# Altium PCB Phaser.PcbDoc (part 6 of 16)
Units mm, origin at the board's own origin, x right, y up, seen from the top; angles counter-clockwise.
Board outline 161.99 x 100 mm, 6 copper layers (TopLayer, MidLayer1, MidLayer2, SignalLayer1, Internal Plane 1, BottomLayer), stack 1.528 mm thick; 1017 components, 665 nets, 3453 pads, 2223 vias.
Unrouted connection lines stored in the file: 1.
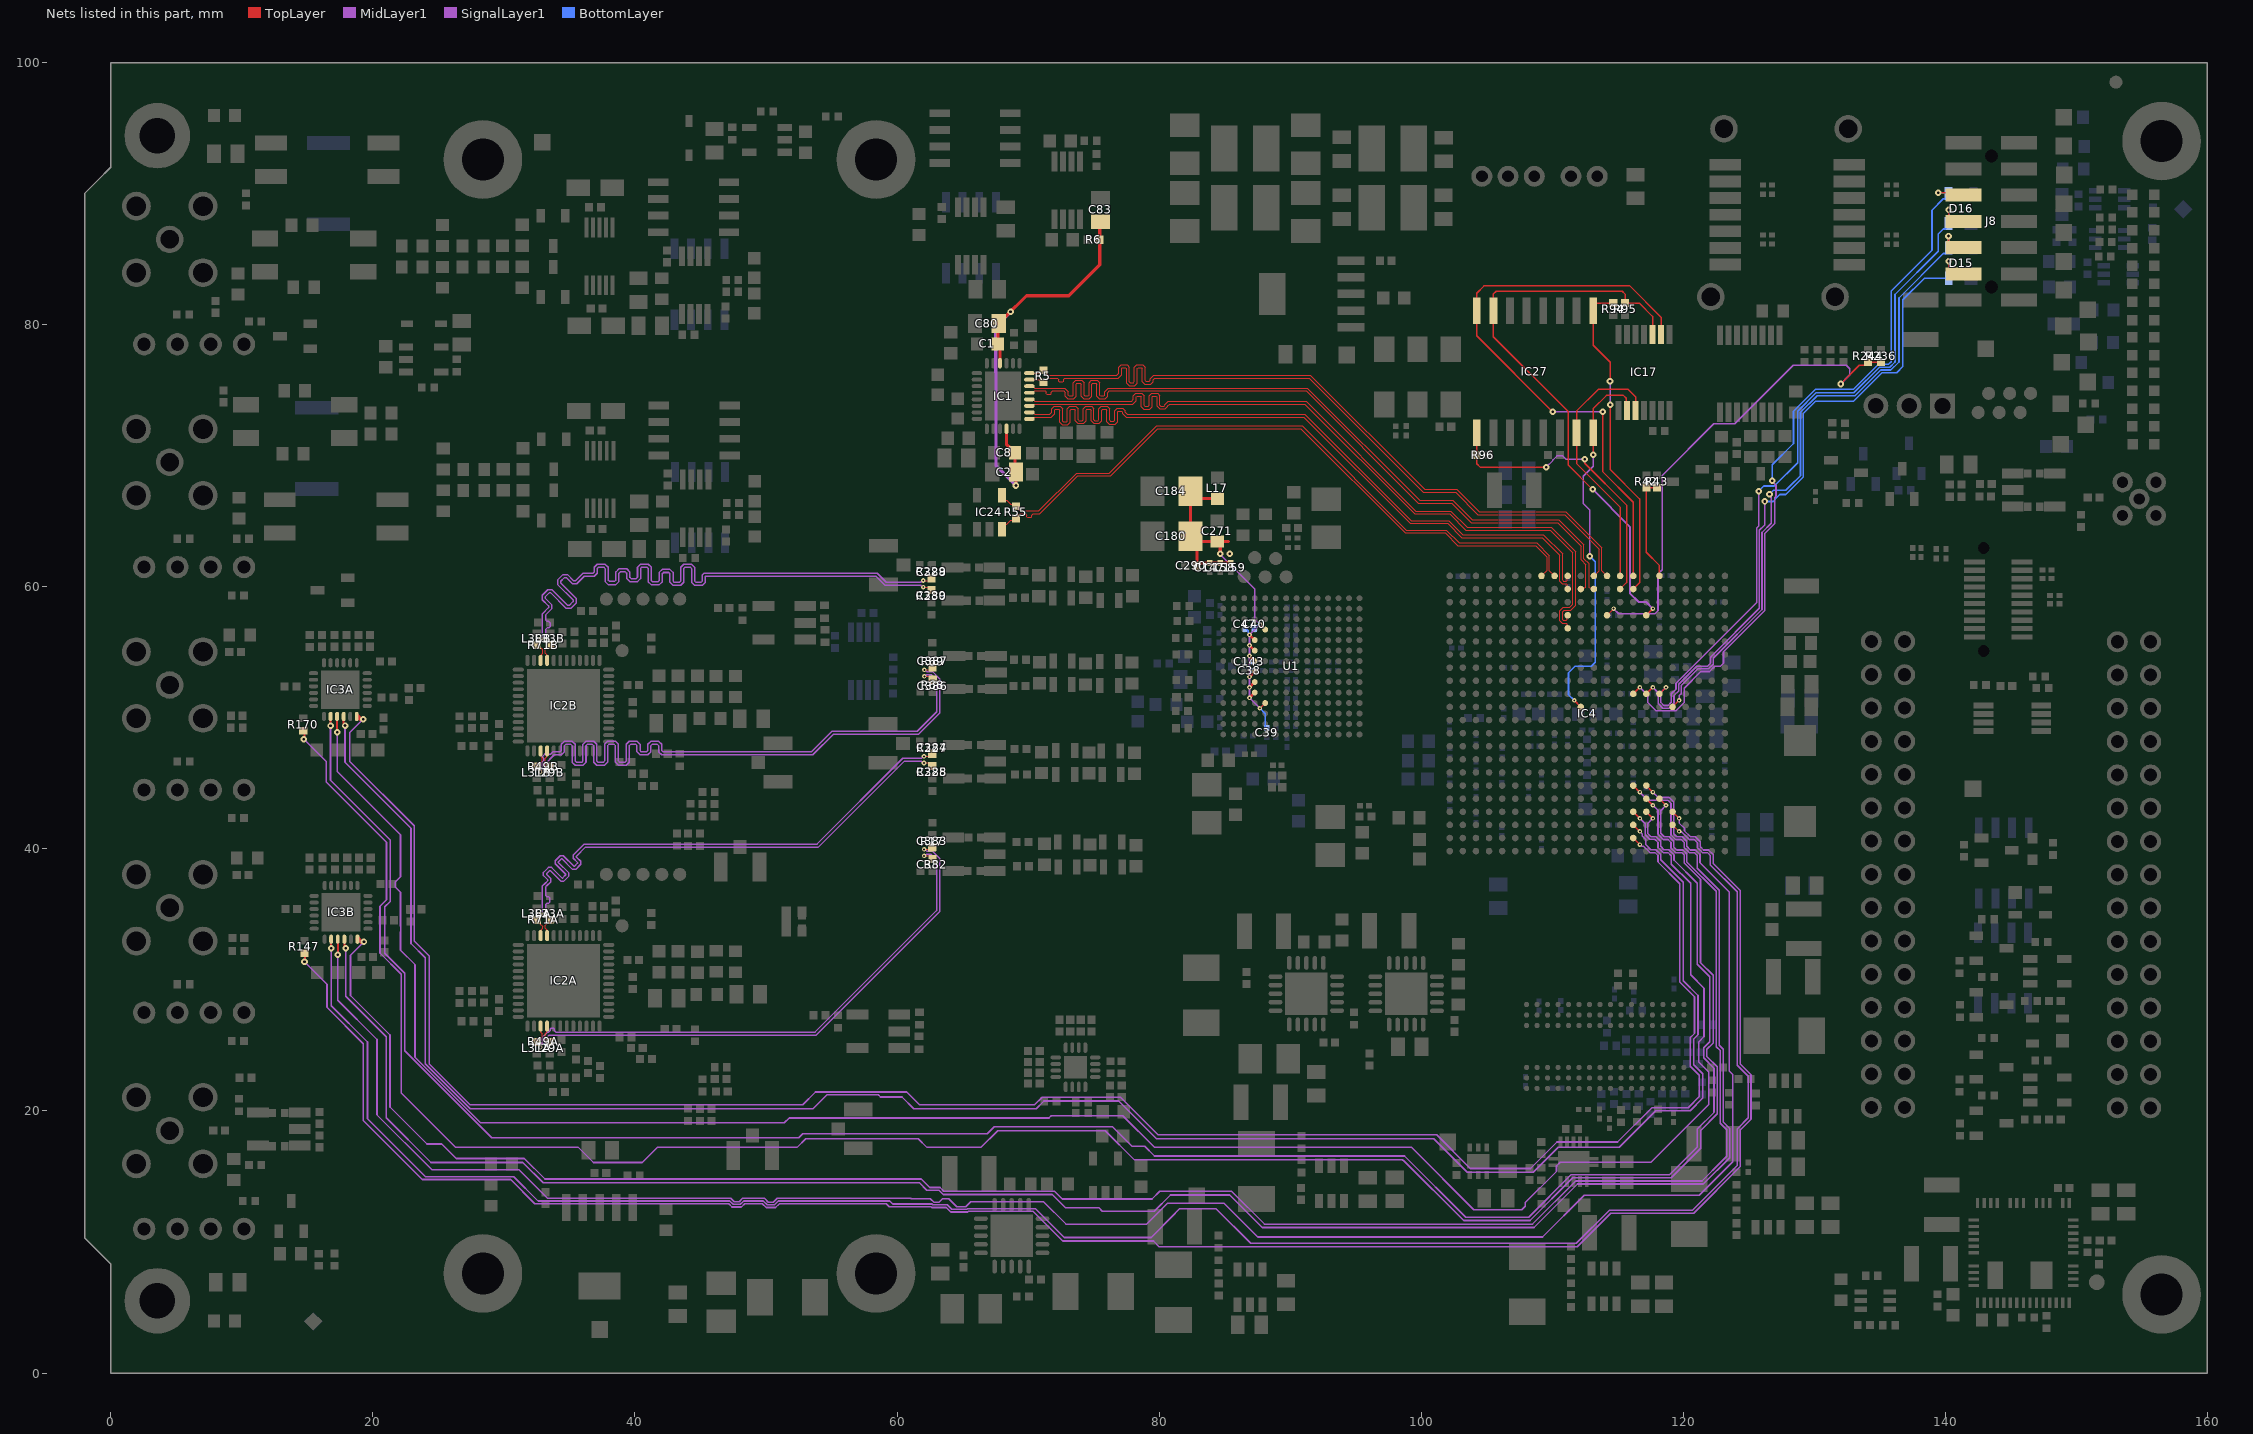
[diagram p8: the nets of this part, all layers, seen from the top]

## Via types
v1: diameter 0.5, hole 0.2, TopLayer to BottomLayer, tented both sides, 1374 vias
v2: diameter 0.35, hole 0.15, TopLayer to BottomLayer, tented both sides, 728 vias
v3: diameter 0.5, hole 0.2, TopLayer to BottomLayer, tented top, 96 vias
v4: diameter 0.6, hole 0.3, TopLayer to BottomLayer, 18 vias
v5: diameter 0.5, hole 0.2, TopLayer to BottomLayer, 5 vias
v6: diameter 0.35, hole 0.15, TopLayer to BottomLayer, 1 vias
v7: diameter 0.8, hole 0.5, TopLayer to BottomLayer, tented both sides, 1 vias

## Nets (pads, with @x,y where several pads share a name; then routed paths per layer and width w, separated by ;. In a path a pad name is that pad's centre, name@x,y a point inside that pad or via, vN(x,y) a via of type N, cw(c..) or ccw(c..) an arc to the next point about the centre after c; other vN are vias at no path point) (continued)
ADC_SCK_N: (continued)
  TopLayer w0.095: IC1.22@70.1,76.3 70.98,76.3 71.168,76.488 R5.1@71.168,76.527 ; R5.1@71.188,76.527 71.43,76.284 71.43,76.264 71.554,76.14 76.664,76.14 76.776,76.14 76.917,76.281 76.917,76.755 77.102,76.94 77.551,76.94 77.737,76.755 77.737,75.621 77.794,75.564 78.06,75.564 78.117,75.621 78.117,76.755 78.302,76.94 78.751,76.94 78.937,76.755 78.937,75.736 78.994,75.679 79.26,75.679 79.317,75.736 79.317,75.871 79.586,76.14 80.291,76.14 91.544,76.14 100.258,67.426 102.706,67.426 104.42,65.712 111.034,65.712 113.785,62.961 113.785,61.215 IC4.N22@114.175,60.825
ADC_SCK_P: IC1.21 IC4.M22 R5.2 | length 56.2
  TopLayer w0.095: IC1.21@70.1,75.8 70.91,75.8 71.123,75.587 R5.2@71.168,75.587 ; R5.2@71.188,75.587 71.43,75.829 71.43,75.849 71.501,75.92 71.807,75.92 71.949,75.92 72.234,75.92 72.329,75.825 72.329,75.681 72.386,75.624 72.652,75.624 72.709,75.681 72.709,75.825 72.804,75.92 73.007,75.92 76.664,75.92 76.867,75.92 77.137,76.19 77.137,76.663 77.194,76.72 77.46,76.72 77.517,76.663 77.517,75.53 77.702,75.344 78.151,75.344 78.337,75.53 78.337,76.663 78.394,76.72 78.66,76.72 78.717,76.663 78.717,75.644 78.902,75.459 79.351,75.459 79.537,75.644 79.537,75.78 79.677,75.92 80.291,75.92 91.453,75.92 100.167,67.206 102.615,67.206 104.329,65.492 110.943,65.492 113.565,62.87 113.565,61.215 IC4.M22@113.175,60.825
ADC_SDOA_N: IC1.16 IC4.K22 | length 56.2
  TopLayer w0.095: IC1.16@70.1,73.3 70.35,73.3 70.492,73.158 71.554,73.158 71.666,73.158 71.807,73.298 71.807,73.568 71.993,73.754 72.441,73.754 72.627,73.568 72.627,72.638 72.684,72.581 72.95,72.581 73.007,72.638 73.007,73.568 73.193,73.754 73.641,73.754 73.827,73.568 73.827,72.738 73.884,72.681 74.15,72.681 74.207,72.738 74.207,73.568 74.393,73.754 74.841,73.754 75.027,73.568 75.027,72.738 75.084,72.681 75.35,72.681 75.407,72.738 75.407,73.568 75.593,73.754 76.041,73.754 76.227,73.568 76.227,72.688 76.284,72.631 76.55,72.631 76.607,72.688 76.607,73.439 76.793,73.625 77.241,73.625 77.427,73.439 77.427,73.298 77.567,73.158 77.681,73.158 91.126,73.158 99.233,65.05 102.096,65.05 103.185,63.96 109.322,63.96 110.781,62.501 110.781,60.493 110.839,60.435 111.055,60.435 111.128,60.507 111.128,60.778 IC4.K22@111.175,60.825
ADC_SDOA_P: IC1.15 IC4.K21 | length 56.2
  TopLayer w0.095: IC1.15@70.1,72.8 70.35,72.8 70.488,72.938 71.554,72.938 71.757,72.938 72.027,73.207 72.027,73.477 72.084,73.534 72.35,73.534 72.407,73.477 72.407,72.547 72.593,72.361 73.041,72.361 73.227,72.547 73.227,73.477 73.284,73.534 73.55,73.534 73.607,73.477 73.607,72.647 73.793,72.461 74.241,72.461 74.427,72.647 74.427,73.477 74.484,73.534 74.75,73.534 74.807,73.477 74.807,72.647 74.993,72.461 75.441,72.461 75.627,72.647 75.627,73.477 75.684,73.534 75.95,73.534 76.007,73.477 76.007,72.597 76.193,72.411 76.641,72.411 76.827,72.597 76.827,73.348 76.884,73.405 77.15,73.405 77.207,73.348 77.207,73.207 77.476,72.938 77.681,72.938 91.035,72.938 99.142,64.83 102.004,64.83 103.094,63.74 109.231,63.74 110.561,62.41 110.561,60.402 110.748,60.215 111.055,60.215 111.128,60.143 111.128,59.872 IC4.K21@111.175,59.825
ADC_SDOB_N: IC1.20 IC4.M21 | length 56.1
  TopLayer w0.095: IC1.20@70.1,75.3 70.35,75.3 70.49,75.16 72.365,75.16 72.8,75.16 73.069,74.891 73.069,74.619 73.126,74.562 73.392,74.562 73.449,74.619 73.449,75.551 73.635,75.737 74.083,75.737 74.269,75.551 74.269,74.619 74.326,74.562 74.592,74.562 74.649,74.619 74.649,75.551 74.835,75.737 75.283,75.737 75.469,75.551 75.469,74.619 75.526,74.562 75.792,74.562 75.849,74.619 75.849,74.891 76.119,75.16 76.322,75.16 91.309,75.16 99.87,66.6 102.402,66.6 103.894,65.108 110.499,65.108 112.417,63.189 112.417,62.143 112.785,61.775 112.785,59.972 112.855,59.902 113.098,59.902 IC4.M21@113.175,59.825
ADC_SDOB_P: IC1.19 IC4.L21 | length 56.1
  TopLayer w0.095: IC1.19@70.1,74.8 70.35,74.8 70.49,74.94 70.875,74.94 71.018,74.94 71.303,74.94 71.398,74.845 71.398,74.726 71.455,74.669 71.721,74.669 71.778,74.726 71.778,74.845 71.873,74.94 72.02,74.94 72.365,74.94 72.709,74.94 72.849,74.799 72.849,74.528 73.035,74.342 73.483,74.342 73.669,74.528 73.669,75.46 73.726,75.517 73.992,75.517 74.049,75.46 74.049,74.528 74.235,74.342 74.683,74.342 74.869,74.528 74.869,75.46 74.926,75.517 75.192,75.517 75.249,75.46 75.249,74.528 75.435,74.342 75.883,74.342 76.069,74.528 76.069,74.799 76.21,74.94 76.322,74.94 91.218,74.94 99.778,66.38 102.311,66.38 103.803,64.888 110.408,64.888 112.197,63.098 112.197,62.051 112.565,61.684 112.565,59.972 112.495,59.902 112.252,59.902 IC4.L21@112.175,59.825
ASSY_Variant: IC4.N19 R236.1 R244.2 | length 37.9
  TopLayer w0.095: IC4.N19@114.175,57.825 v2(114.675,58.325)
  TopLayer w0.127: v1(131.998,75.469) 133.433,76.904 133.865,76.904 R244.2@134.092,77.13 ; R244.2@134.244,77.283 134.244,77.224 134.338,77.13 R236.1@135.087,77.13
  SignalLayer1 w0.127: v2(114.675,58.325) 115.064,57.937 117.836,57.937 118.064,58.164 118.064,60.968 118.382,61.287 118.382,68.489 122.322,72.429 123.916,72.429 128.391,76.904 132.423,76.904 132.695,76.633 132.695,76.166 v1(131.998,75.469)
ATT_CLK0: IC3A.21 IC4.R4 | length 162
  TopLayer w0.125: IC4.R4@116.175,42.825 v2(116.675,42.325)
  TopLayer w0.152: v1(17.275,48.9) IC3A.21@17.275,50.1
  SignalLayer1 w0.125: v1(17.275,48.9) 17.275,45.9 22.113,41.062 22.113,37.871 21.712,37.47 21.712,37.087 22.113,36.687 22.113,34.095 22.137,34.07 22.137,33.687 22.113,33.663 22.113,32.27 23.216,31.167 23.216,24.098 28.222,19.092 51.398,19.092 51.766,19.46 71.597,19.46 71.769,19.631 77.23,19.631 79.639,17.222 99.257,17.222 104.014,12.465 107.67,12.465 107.941,12.736 107.941,13.01 110.316,15.385 110.316,15.803 110.606,16.093 117.534,16.093 121.937,20.496 121.937,22.967 121.167,23.737 121.167,25.266 121.578,25.677 121.578,29.37 120.553,30.395 120.553,37.364 119.086,38.831 119.086,39.462 118.836,39.712 118.455,39.712 118.063,40.105 118.063,40.485 117.823,40.725 117.442,40.725 117.086,41.081 117.086,41.914 v2(116.675,42.325)
ATT_CLK1: IC3B.21 IC4.T6 | length 159
  TopLayer w0.125: IC4.T6@117.175,44.825 v2(117.675,44.325)
  TopLayer w0.152: v1(17.325,31.904) IC3B.21@17.325,33.104
  SignalLayer1 w0.125: v1(17.325,31.904) 17.325,28.444 20.323,25.446 20.323,19.696 24.511,15.508 31.151,15.508 33.331,13.328 47.32,13.328 47.576,13.072 47.959,13.072 48.215,13.328 49.882,13.328 50.178,13.032 50.561,13.032 50.858,13.328 61.041,13.328 61.067,13.303 62.545,13.303 62.816,13.032 63.199,13.032 63.469,13.303 63.954,13.303 64.562,12.695 65.241,12.695 65.625,13.079 71.179,13.079 72.892,11.366 79.051,11.366 80.627,12.942 84.963,12.942 87.528,10.378 109.25,10.378 112.431,13.559 121.204,13.559 123.762,16.117 123.762,22.778 123.501,23.039 123.501,36.699 121.27,38.93 121.27,39.562 120.919,39.914 120.535,39.914 120.264,40.185 120.264,40.569 119.919,40.914 119.49,40.914 119.264,41.14 119.264,43.569 118.919,43.914 118.086,43.914 v2(117.675,44.325)
ATT_LE0: IC3A.22 IC4.R3 | length 157.2
  TopLayer w0.125: IC4.R3@116.175,41.825 v2(116.675,41.325)
  TopLayer w0.152: IC3A.22@17.775,50.1 17.775,49.511 v1(17.879,49.407)
  SignalLayer1 w0.125: v1(17.879,49.407) 17.879,46.602 22.916,41.566 22.916,32.775 23.998,31.693 23.998,23.6 27.431,20.167 53.586,20.167 54.662,21.243 58.558,21.243 58.742,21.06 60.378,21.06 61.27,20.167 70.627,20.167 71.212,20.753 76.927,20.753 79.795,17.884 100.952,17.884 103.516,15.321 108.556,15.321 110.458,17.222 115.099,17.222 117.893,20.016 120.516,20.016 121.488,20.987 121.488,22.837 120.799,23.526 120.799,25.489 121.115,25.805 121.115,28.813 119.984,29.943 119.984,37.454 118.264,39.174 118.264,39.569 117.895,39.937 117.515,39.937 117.127,40.325 117.127,40.718 116.87,40.975 116.87,41.13 v2(116.675,41.325)
ATT_LE1: IC3B.22 IC4.R6 | length 157
  TopLayer w0.125: IC4.R6@116.175,44.825 v2(116.675,44.325)
  TopLayer w0.152: IC3B.22@17.825,33.104 17.825,32.515 v1(17.929,32.411)
  SignalLayer1 w0.125: v1(17.929,32.411) 17.929,28.75 21.014,25.665 21.014,19.49 24.434,16.069 31.438,16.069 32.995,14.513 61.721,14.513 62.277,13.957 63.199,13.957 63.535,13.621 71.845,13.621 72.867,12.599 75.421,12.599 75.666,12.354 79.635,12.354 80.862,13.58 85.393,13.58 87.866,11.108 108.6,11.108 111.917,14.425 121.519,14.425 123.532,16.438 123.532,18.658 123.034,19.156 123.034,24.708 122.739,25.002 122.739,36.845 121.063,38.522 121.063,39.485 120.836,39.712 120.452,39.712 120.063,40.102 120.063,40.485 119.836,40.712 119.665,40.712 119.407,40.712 119.063,41.057 119.063,43.485 118.836,43.712 117.288,43.712 v2(116.675,44.325)
ATT_RST0n: IC3A.20 IC4.T4 | length 164.4
  TopLayer w0.125: IC4.T4@117.175,42.825 v2(117.675,42.325)
  TopLayer w0.152: v1(16.775,49.4) IC3A.20@16.775,50.1
  SignalLayer1 w0.125: v1(16.775,49.4) 16.775,45.224 21.323,40.676 21.323,35.985 20.916,35.578 20.916,32.034 22.439,30.511 22.439,24.59 29.085,17.944 52.49,17.944 52.801,18.256 66.889,18.256 67.423,18.789 76.443,18.789 77.935,17.297 78.904,17.297 79.639,16.562 98.725,16.562 103.391,11.895 108.198,11.895 111.43,15.128 118.948,15.128 121.065,17.245 121.065,18.616 122.336,19.887 122.336,23.264 121.545,24.054 121.545,24.811 122.019,25.284 122.019,30.238 121.061,31.196 121.061,37.374 119.288,39.147 119.288,39.545 118.895,39.937 118.515,39.937 118.264,40.188 118.264,40.569 117.906,40.926 117.526,40.926 117.288,41.164 117.288,41.937 v2(117.675,42.325)
ATT_RST1n: IC3B.20 IC4.V3 | length 157.4
  TopLayer w0.125: IC4.V3@119.175,41.825 v2(119.675,41.325)
  TopLayer w0.152: v1(16.825,32.404) IC3B.20@16.825,33.104
  SignalLayer1 w0.125: v1(16.825,32.404) 16.825,28.029 19.591,25.263 19.591,19.395 24.013,14.973 30.764,14.973 32.61,13.127 47.236,13.127 47.493,12.871 48.042,12.871 48.299,13.127 49.799,13.127 50.095,12.831 50.645,12.831 50.941,13.127 59.437,13.127 59.663,12.9 62.663,12.9 62.732,12.831 63.842,12.831 64.18,12.493 65.324,12.493 65.374,12.543 70.56,12.543 72.757,10.346 79.39,10.346 81.225,12.181 81.225,12.217 81.551,12.543 84.333,12.543 86.983,9.893 111.838,9.893 114.371,12.426 120.691,12.426 124.126,15.861 124.126,18.64 124.958,19.472 124.958,22.641 124.107,23.491 124.107,36.722 122.063,38.767 122.063,39.485 121.836,39.712 121.455,39.712 121.08,40.088 121.08,40.468 120.836,40.712 120.455,40.712 119.886,41.282 119.718,41.282 v2(119.675,41.325)
ATT_S_IN0: IC3A.24 IC4.R2 | length 156.1
  TopLayer w0.125: IC4.R2@116.175,40.825 v2(116.675,40.325)
  TopLayer w0.3: IC3A.24@18.775,50.1 18.825,50.15 19.075,49.9 v1(19.275,49.9)
  SignalLayer1 w0.125: v1(19.275,49.9) 18.248,48.873 18.248,46.659 23.156,41.751 23.156,32.96 24.298,31.817 24.298,23.584 27.421,20.462 52.801,20.462 53.783,21.444 60.733,21.444 61.715,20.462 70.497,20.462 71.088,21.053 77.051,21.053 79.919,18.185 101.173,18.185 103.746,15.612 108.34,15.612 110.353,17.624 114.977,17.624 117.604,20.252 120.377,20.252 121.223,21.097 121.223,22.727 120.533,23.416 120.533,25.599 120.849,25.915 120.849,28.703 119.718,29.834 119.718,37.344 118.063,39 118.063,39.485 117.836,39.712 117.455,39.712 116.985,40.183 116.861,40.183 116.718,40.325 v2(116.675,40.325)
ATT_S_IN1: IC3B.24 IC4.U5 | length 153.5
  TopLayer w0.125: IC4.U5@118.175,43.825 v2(118.675,43.325)
  TopLayer w0.3: IC3B.24@18.825,33.104 18.875,33.154 19.125,32.904 v1(19.325,32.904)
  SignalLayer1 w0.125: v1(19.325,32.904) 18.298,31.876 18.298,28.806 21.314,25.789 21.314,20.305 24.138,17.481 25.26,17.481 26.372,16.37 31.562,16.37 33.131,14.801 61.858,14.801 62.5,14.159 63.282,14.159 63.565,13.875 72.016,13.875 72.612,13.279 79.455,13.279 80.057,13.881 85.518,13.881 88.032,11.366 108.493,11.366 111.78,14.653 121.424,14.653 122.96,16.189 122.974,16.189 123.245,16.46 123.245,16.473 123.303,16.532 123.303,18.564 122.805,19.062 122.805,24.613 122.511,24.908 122.511,36.753 120.264,39.001 120.264,39.616 119.966,39.914 119.488,39.914 119.264,40.138 119.264,40.571 118.921,40.914 118.538,40.914 118.264,41.188 118.264,42.914 v2(118.675,43.325)
ATT_S_OUT0: IC4.T5 R170.1 | length 169.6
  TopLayer w0.125: IC4.T5@117.175,43.825 v2(117.675,43.325)
  TopLayer w0.152: v1@14.775,48.4 R170.1@14.775,49.1
  SignalLayer1 w0.125: v1(14.735,48.375) 16.453,46.657 16.453,45.095 21.042,40.507 21.042,36.117 20.55,35.625 20.55,32.049 22.171,30.429 22.171,21.364 26.319,17.215 35.688,17.215 36.834,16.069 40.561,16.069 41.707,17.215 52.366,17.215 53.035,17.885 61.618,17.885 62.287,17.215 62.845,17.215 66.398,17.215 67.675,18.492 75.887,18.492 78.117,16.263 80.904,16.263 98.567,16.263 98.585,16.244 98.637,16.244 103.237,11.644 108.302,11.644 111.569,14.912 119.087,14.912 121.316,17.141 121.316,18.512 122.587,19.783 122.587,23.368 121.796,24.158 121.796,24.707 122.27,25.18 122.27,30.342 121.312,31.3 121.312,37.668 120.063,38.917 120.063,39.533 119.883,39.712 119.405,39.712 119.063,40.055 119.063,40.164 119.063,40.485 118.836,40.712 118.455,40.712 118.063,41.105 118.063,42.937 v2(117.675,43.325)
ATT_S_OUT1: IC4.V4 R147.1 | length 157.1
  TopLayer w0.125: IC4.V4@119.175,42.825 v2(119.675,42.325)
  TopLayer w0.152: v1@14.825,31.404 R147.1@14.825,32.104
  SignalLayer1 w0.125: v1(14.785,31.379) 16.503,29.66 16.503,27.9 19.272,25.132 19.272,19.263 23.763,14.772 30.515,14.772 32.361,12.926 47.153,12.926 47.409,12.67 48.126,12.67 48.382,12.926 49.715,12.926 50.012,12.63 50.728,12.63 51.024,12.926 59.187,12.926 59.414,12.699 62.58,12.699 62.649,12.63 63.759,12.63 64.097,12.292 65.408,12.292 65.448,12.333 70.393,12.333 72.656,10.07 79.565,10.07 79.993,9.643 111.91,9.643 114.466,12.198 120.785,12.198 124.345,15.758 124.345,18.549 125.159,19.363 125.159,22.751 124.335,23.574 124.335,36.817 122.27,38.882 122.27,39.562 121.919,39.914 121.538,39.914 121.288,40.164 121.288,40.545 120.919,40.914 120.538,40.914 120.086,41.366 120.086,41.566 119.675,41.978 v2(119.675,42.325)
AVDD33: C38.2 C39.2 C40.2 C47.2 C143.2 C147.2 C158.2 C159.2 C180.1 C184.1 C271.2 C290.2 L17.1 U1.D10 U1.E11 U1.F11 U1.G11 U1.H11 U1.J11 U1.K11 U1.L10 | length 36.3
  TopLayer w0.125: v2(87.693,50.725) U1.D10@88.093,51.125
  TopLayer w0.2: v2(86.893,51.525) U1.E11@87.293,51.925 ; v2(86.893,52.325) U1.F11@87.293,52.725 ; v2(86.893,53.125) U1.G11@87.293,53.525 ; v2(86.893,54.725) U1.H11@87.293,54.325 ; v2(86.893,55.525) U1.J11@87.293,55.125 ; v2(86.893,56.325) U1.K11@87.293,55.925 ; v2(87.701,57.122) 87.701,57.119 88.093,56.727 U1.L10@88.093,56.725
  TopLayer w0.25: C180.1@82.893,63.35 C290.2@82.893,61.6 83.099,61.806 C147.2@83.862,61.806 C158.2@84.663,61.806 C159.2@85.462,61.806 ; L17.1@84.443,66.725 82.757,66.725 82.393,67.089 C180.1@82.393,63.85 82.793,63.45 C271.2@84.443,63.45 85.267,63.45 ; C271.2@84.543,63.349 84.663,63.229 v1(84.663,62.518)
  MidLayer1 w0.125: v1@84.625,62.525 84.625,62.5 87.3,59.825 87.3,57.518 v2@87.696,57.122 ; v2(87.693,50.725) v2(86.893,51.525) v2(86.893,52.325) v2(86.893,53.125) v2(86.893,54.725) v2(86.893,55.525) v2(86.893,56.325) 86.899,56.325 v2@87.695,57.122 ; v2@87.695,57.122 v2(87.701,57.122) v2@87.696,57.122
  BottomLayer w0.125: C47.2@86.657,56.769 86.789,56.637 86.789,56.466 86.893,56.363 v2(86.893,56.325) ; v2(86.893,53.125) 86.893,53.17 87.034,53.311 87.034,53.389 87.059,53.414 87.059,53.487 C38.2@87.221,53.65 ; v2(86.893,54.725) 86.893,54.554 C143.2@87.221,54.225 ; C40.2@87.178,56.772 87.484,57.079 87.658,57.079 v2(87.701,57.122) ; v2(87.693,50.725) 88.105,50.312 88.105,49.338 C39.2@88.218,49.225
  other v1: 85.378,62.518
BBIA_N: C383.2 IC2A.28 L29A.1 R17.1 R49A.1 | length 42.8
  TopLayer w0.095: IC2A.28@33.275,26.475 33.263,26.463 33.263,26.014 33.147,25.898 33.147,25.518 33.203,25.462 33.217,25.462 33.287,25.392 v2(33.287,24.85) ; v2(62.064,39.964) 62.476,39.964 C383.2@62.696,40.184
  SignalLayer1 w0.115: v2(33.287,24.85) 33.287,24.902 33.155,25.034 33.155,25.48 33.459,25.784 53.841,25.784 63.251,35.194 63.251,39.273 62.693,39.831 62.249,39.831 62.116,39.964 v2(62.064,39.964)
BBIA_P: C382.2 IC2A.27 L31A.1 R3.1 R49A.2 | length 42.8
  TopLayer w0.095: v2(32.787,24.85) 32.787,25.285 32.787,25.575 32.927,25.715 32.927,25.897 32.824,26 32.824,26.426 IC2A.27@32.796,26.454 ; v2(62.064,39.464) 62.476,39.464 R3.1@62.696,39.244
  SignalLayer1 w0.115: v2(32.787,24.85) 32.787,24.902 32.92,25.034 32.92,25.577 33.361,26.019 33.419,26.019 33.534,26.134 33.534,26.25 33.597,26.313 33.786,26.313 33.849,26.25 33.849,26.134 33.964,26.019 34.082,26.019 53.743,26.019 63.016,35.291 63.016,39.176 62.595,39.596 62.249,39.596 62.116,39.464 v2(62.064,39.464)
BBIB_N: C387.2 IC2B.28 L29B.1 R49B.1 R69.1 | length 49.8
  TopLayer w0.095: IC2B.28@33.279,47.496 33.261,47.478 33.261,47.028 33.151,46.919 33.151,46.594 33.224,46.521 33.224,46.297 33.288,46.234 33.288,45.875 v2@33.292,45.871 ; v2(62.08,53.654) 62.492,53.654 C387.2@62.712,53.874
  SignalLayer1 w0.115: v2(33.288,45.85) 33.288,45.902 33.155,46.034 33.155,46.48 33.847,47.172 34.383,47.172 34.617,47.406 34.617,47.875 34.713,47.971 35.111,47.971 35.207,47.875 35.207,46.607 35.441,46.373 36.033,46.373 36.267,46.607 36.267,47.875 36.363,47.971 36.761,47.971 36.857,47.875 36.857,46.607 37.091,46.373 37.683,46.373 37.917,46.607 37.917,47.875 38.013,47.971 38.411,47.971 38.507,47.875 38.507,46.607 38.741,46.373 39.333,46.373 39.567,46.607 39.567,47.875 39.663,47.971 40.061,47.971 40.157,47.875 40.157,47.406 40.391,47.172 40.983,47.172 41.217,47.406 41.217,47.875 41.313,47.971 41.711,47.971 41.807,47.875 41.807,47.406 42.041,47.172 53.573,47.172 55.141,48.74 61.641,48.74 63.267,50.366 63.267,52.964 62.709,53.522 62.265,53.522 62.132,53.654 v2(62.08,53.654)
BBIB_P: C386.2 IC2B.27 L31B.1 R49B.2 R68.1 | length 49.9
  TopLayer w0.095: L31B.1@32.5,46.297 32.523,46.297 32.767,46.541 32.767,46.565 32.931,46.728 32.931,46.756 32.931,46.919 32.837,47.013 32.837,47.438 IC2B.27@32.8,47.475 ; v2@32.792,45.871 R49B.2@32.792,46.258 ; v2(62.08,53.154) 62.492,53.154 R68.1@62.712,52.934
  SignalLayer1 w0.115: v2(32.788,45.85) 32.788,45.902 32.92,46.034 32.92,46.577 33.01,46.667 33.05,46.708 33.05,46.87 32.979,46.942 32.979,47.082 33.189,47.292 33.329,47.292 33.4,47.22 33.563,47.22 33.75,47.407 34.286,47.407 34.382,47.503 34.382,47.972 34.616,48.206 35.208,48.206 35.442,47.972 35.442,46.704 35.538,46.608 35.936,46.608 36.032,46.704 36.032,47.972 36.266,48.206 36.858,48.206 37.092,47.972 37.092,46.704 37.188,46.608 37.586,46.608 37.682,46.704 37.682,47.972 37.916,48.206 38.508,48.206 38.742,47.972 38.742,46.704 38.838,46.608 39.236,46.608 39.332,46.704 39.332,47.972 39.566,48.206 40.158,48.206 40.392,47.972 40.392,47.503 40.488,47.407 40.886,47.407 40.982,47.503 40.982,47.972 41.216,48.206 41.808,48.206 42.042,47.972 42.042,47.503 42.138,47.407 53.475,47.407 55.044,48.975 61.544,48.975 63.032,50.464 63.032,52.866 62.611,53.287 62.265,53.287 62.132,53.154 v2(62.08,53.154)
BBQA_N: C385.2 IC2A.9 L33A.1 R71A.2 R228.1 | length 42.7
  TopLayer w0.095: IC2A.9@33.3,33.375 33.272,33.403 33.272,33.829 33.168,33.932 33.168,34.159 33.276,34.267 33.276,34.639 33.312,34.676 33.312,34.975 v2@33.308,34.979 ; v2(62.055,46.55) 62.466,46.55 R228.1@62.686,46.33
  SignalLayer1 w0.115: v2(33.312,35) 33.312,35.053 33.18,35.185 33.18,35.358 33.18,35.738 33.295,35.853 33.41,35.853 33.509,35.952 33.509,36.249 33.41,36.348 33.295,36.348 33.18,36.463 33.18,37.079 33.277,37.177 33.593,37.492 33.593,37.724 33.255,38.061 33.255,38.099 33.501,38.344 33.538,38.344 34.348,37.535 34.58,37.535 34.963,37.918 34.963,38.15 34.153,38.959 34.153,38.997 34.399,39.242 34.436,39.242 35.246,38.433 35.478,38.433 35.861,38.816 35.861,39.048 35.523,39.385 35.523,39.423 36.233,40.132 53.998,40.132 60.539,46.673 61.87,46.673 61.993,46.55 v2(62.055,46.55)
BBQA_P: C384.2 IC2A.10 L38A.1 R71A.1 R227.1 | length 42.9
  TopLayer w0.095: R71A.1@32.55,34.569 32.67,34.569 R71A.1@32.756,34.484 ; R71A.1@32.769,34.382 32.769,34.262 32.948,34.082 32.948,33.931 32.839,33.822 32.839,33.372 IC2A.10@32.821,33.354 ; R71A.1@32.808,34.371 v2@32.808,34.979 ; v2(62.055,47.05) 62.466,47.05 C384.2@62.686,47.27
  SignalLayer1 w0.115: v2(32.812,35) 32.812,35.053 32.945,35.185 32.945,36.843 32.945,37.177 33.111,37.343 33.358,37.589 33.358,37.627 33.02,37.964 33.02,38.196 33.403,38.579 33.635,38.579 34.445,37.77 34.482,37.77 34.728,38.015 34.728,38.053 33.918,38.862 33.918,39.094 34.301,39.477 34.533,39.477 35.343,38.668 35.38,38.668 35.626,38.913 35.626,38.951 35.288,39.288 35.288,39.52 36.135,40.367 53.9,40.367 60.441,46.908 61.87,46.908 62.012,47.05 v2(62.055,47.05)
BBQB_N: C389.2 IC2B.9 L33B.1 R71B.2 R230.1 | length 49.8
  TopLayer w0.095: 33.168,55.291 33.168,54.932 33.272,54.829 33.272,54.403 IC2B.9@33.3,54.375 ; 33.169,55.292 33.169,55.317 33.225,55.373 33.267,55.373 33.308,55.414 33.308,55.706 33.313,55.71 33.313,55.975 v2@33.308,55.979 ; v2(62.002,59.974) 62.413,59.974 C389.2@62.633,59.754
  SignalLayer1 w0.115: v2(33.313,56) 33.313,56.053 33.18,56.185 33.18,56.358 33.18,56.738 33.295,56.853 33.431,56.853 33.53,56.952 33.53,57.249 33.431,57.348 33.295,57.348 33.18,57.463 33.18,57.843 33.642,58.306 33.642,58.637 33.169,59.11 33.169,59.246 33.45,59.527 33.586,59.527 34.767,58.347 35.097,58.347 35.516,58.765 35.516,59.096 34.335,60.277 34.335,60.413 34.617,60.694 34.753,60.694 35.226,60.22 35.557,60.22 36.129,60.793 36.898,60.793 37.131,61.027 37.131,61.382 37.228,61.478 37.625,61.478 37.721,61.382 37.721,60.401 37.955,60.167 38.548,60.167 38.781,60.401 38.781,61.033 38.878,61.129 39.275,61.129 39.371,61.033 39.371,60.623 39.605,60.389 40.198,60.389 40.431,60.623 40.431,61.382 40.528,61.478 40.925,61.478 41.021,61.382 41.021,60.369 41.255,60.136 41.848,60.136 42.081,60.369 42.081,60.988 42.178,61.084 42.575,61.084 42.671,60.988 42.671,60.341 42.905,60.108 43.498,60.108 43.731,60.341 43.731,61.382 43.828,61.478 44.225,61.478 44.321,61.382 44.321,60.341 44.555,60.108 45.148,60.108 45.381,60.341 45.381,60.793 58.392,60.793 59.079,60.106 61.817,60.106 61.949,59.974 v2(62.002,59.974)
BBQB_P: C388.2 IC2B.10 L38B.1 R71B.1 R229.1 | length 49.7
  TopLayer w0.095: v2@32.808,55.979 32.808,55.326 32.948,55.186 32.948,54.931 32.833,54.815 32.833,54.366 IC2B.10@32.821,54.354 ; v2(62.002,60.474) 62.413,60.474 C388.2@62.633,60.694
  SignalLayer1 w0.115: v2(32.813,56) 32.813,56.053 32.945,56.185 32.945,56.738 32.945,57.463 32.945,57.941 33.407,58.403 33.407,58.539 32.934,59.013 32.934,59.344 33.353,59.762 33.683,59.762 34.864,58.582 35,58.582 35.281,58.863 35.281,58.999 34.1,60.18 34.1,60.51 34.519,60.929 34.85,60.929 35.324,60.455 35.46,60.455 36.032,61.028 36.8,61.028 36.896,61.124 36.896,61.479 37.13,61.713 37.723,61.713 37.956,61.479 37.956,60.498 38.053,60.402 38.45,60.402 38.546,60.498 38.546,61.13 38.78,61.364 39.373,61.364 39.606,61.13 39.606,60.72 39.703,60.624 40.1,60.624 40.196,60.72 40.196,61.479 40.43,61.713 41.023,61.713 41.256,61.479 41.256,60.467 41.353,60.371 41.75,60.371 41.846,60.467 41.846,61.086 42.08,61.319 42.673,61.319 42.906,61.086 42.906,60.439 43.003,60.343 43.4,60.343 43.496,60.439 43.496,61.479 43.73,61.713 44.323,61.713 44.556,61.479 44.556,60.439 44.653,60.343 45.05,60.343 45.146,60.439 45.146,60.909 45.265,61.028 58.489,61.028 59.176,60.341 61.817,60.341 v2@61.949,60.474
CFG_CCLK: IC4.L12 IC17.2 IC27.16 | length 29.4
  TopLayer w0.115: v1(113.12,70.07) IC27.16@113.12,71.75 113.12,73.591 114.129,74.6 115.43,74.6 115.65,74.38 115.65,73.5 IC17.2@115.7,73.45
  TopLayer w0.125: v2(111.675,51.325) IC4.L12@112.175,50.825
  SignalLayer1 w0.125: v1(112.865,62.328) 112.865,65.851 112.36,66.356 112.36,68.43 113.12,69.19 v1(113.12,70.07)
  BottomLayer w0.125: v2(111.675,51.325) 111.235,51.765 111.235,53.433 111.737,53.935 112.981,53.935 113.288,54.241 113.288,59.164 ; v1(112.865,62.328) 113.288,61.905 113.288,59.486 113.287,59.165
CFG_D02: IC4.P21 IC27.9 R96.1 | length 22.6
  TopLayer w0.115: IC27.9@104.23,71.75 R96.1@104.23,70.05 104.23,69.388 104.493,69.125 v1(109.546,69.125) ; v1(112.475,69.725) 112.475,69.42 115.67,66.225 115.67,60.32 IC4.P21@115.175,59.825
  SignalLayer1 w0.115: v1(109.546,69.125) 110.05,69.629 110.05,69.67 110.358,69.977 110.792,69.977 111.045,69.725 v1(112.475,69.725)
CFG_D03: IC4.R21 IC27.1 R94.1 | length 24.9
  TopLayer w0.115: v1(114.403,75.684) 114.403,77.115 114.417,77.128 113.12,78.425 IC27.1@113.12,81.05 113.12,81.47 113.295,81.645 R94.1@114.65,81.645 ; v1(114.417,73.876) 114.417,68.944 116.659,66.702 116.659,60.309 IC4.R21@116.175,59.825
  SignalLayer1 w0.115: v1(114.403,75.684) 114.403,73.89 v1(114.417,73.876)
CFG_DIN: IC4.R22 IC17.9 IC27.8 | length 45.4
  TopLayer w0.115: v1(110.036,73.341) 104.23,79.147 IC27.8@104.23,81.05 104.23,82.393 104.786,82.948 115.921,82.948 118.3,80.569 IC17.9@118.3,79.25 ; v1(113.836,73.341) 113.836,68.789 116.175,66.45 IC4.R22@116.175,60.825
  SignalLayer1 w0.115: v1@110.003,73.341 v1(110.036,73.341) v1(113.836,73.341)
CFG_FCS: IC4.T19 IC17.10 IC27.7 R95.1 | length 44.9
  TopLayer w0.115: v1(113.075,67.425) 111.209,69.291 111.209,73.366 105.5,79.075 IC27.7@105.5,81.05 105.5,82.325 105.725,82.55 115.33,82.55 115.55,82.33 R95.1@115.55,81.645 116.627,81.645 117.65,80.622 IC17.10@117.65,79.25
  TopLayer w0.125: IC4.T19@117.175,57.825 v2(117.675,58.325)
  SignalLayer1 w0.152: v1(113.075,67.425) 115.925,64.575 115.925,59.508 116.599,58.834 117.166,58.834 v2(117.675,58.325)
CFG_MOSI: IC4.P22 IC17.3 IC27.15 | length 20.4
  TopLayer w0.115: IC4.P22@115.175,60.825 115.175,66.075 111.85,69.4 IC27.15@111.85,71.75 111.85,73.4 113.5,75.05 115.8,75.05 116.35,74.5 IC17.3@116.35,73.45
CFG_PUDC_B: IC4.U22 R42.1 R43.2 | length 8
  TopLayer w0.115: R43.2@117.984,67.55 117.981,67.553 117.177,67.553 R42.1@117.175,67.555 117.175,62.622 118.175,61.622 IC4.U22@118.175,60.825
CFG_TCK: D15.3 IC4.V12 J8.6 | length 49
  TopLayer w0.125: IC4.V12@119.175,50.825 v2(119.675,51.325)
  TopLayer w0.127: v1(140.234,86.759) 140.234,85.832 J8.6@140.249,85.817
  SignalLayer1 w0.125: v2(119.675,51.325) 119.675,51.671 119.839,51.835 119.839,52.465 121.11,53.736 121.919,53.736 122.27,54.087 122.27,54.533 126.001,58.264 126.001,64.141 126.706,64.846 126.706,66.925 v1(126.575,67.056)
  BottomLayer w0.125: v1(126.575,67.056) 126.874,67.355 127.824,67.355 128.168,67.7
  BottomLayer w0.127: 128.167,67.7 128.935,68.468 128.935,73.302 130.209,74.576 133.103,74.576 135.062,76.535 135.836,76.535 136.449,77.148 136.449,82.034 139.841,85.426 140.012,85.426 140.249,85.662 D15.3@140.249,85.834 140.234,85.849 v1(140.234,86.759)
CFG_TDI: D16.3 IC4.R13 J8.10 | length 57.3
  TopLayer w0.125: IC4.R13@116.175,51.825 v2(116.675,52.325)
  TopLayer w0.127: v1(139.457,90.055) 140.105,90.055 J8.10@140.243,89.916
  SignalLayer1 w0.125: v2(116.675,52.325) 117.288,51.713 117.288,51.165 117.917,50.535 119.433,50.535 119.903,51.005 120.063,51.165 120.063,52.261 121.337,53.535 122.002,53.535 122.405,53.937 122.836,53.937 123.063,54.164 123.063,55.041 126.203,58.181 126.203,64.058 126.969,64.825 126.969,66.797 127.067,66.894 127.067,67.732 126.78,68.019 v1(126.78,68.09)
  BottomLayer w0.125: v1(126.78,68.09) 126.78,69.299 128.405,70.924 128.405,73.382 130.091,75.067 132.984,75.067 134.883,76.966 135.656,76.966 135.857,77.167
  BottomLayer w0.127: 135.857,77.167 135.857,82.566 138.975,85.685 138.975,88.736 139.836,89.597 140.007,89.597 140.243,89.833 140.022,90.055 v1(139.457,90.055)
CFG_TDO: D16.2 IC4.U13 J8.8 | length 53
  TopLayer w0.125: IC4.U13@118.175,51.825 v2(118.675,52.325)
  TopLayer w0.127: J8.8@140.243,87.793 v1(140.243,88.748)
  SignalLayer1 w0.125: v2(118.675,52.325) 118.288,51.938 118.288,51.165 118.515,50.938 118.836,50.938 119.086,51.188 119.086,51.826 119.437,52.176 119.437,52.635 121.515,54.713 125.599,58.797 125.599,64.474 125.74,64.615 v1(125.74,67.295)
  BottomLayer w0.127: v1(125.74,67.295) 126.133,67.688 126.947,67.688 128.719,69.459 128.719,73.391 130.12,74.792 133.013,74.792 134.972,76.751 135.747,76.751 136.144,77.149 136.144,82.296 139.457,85.609 139.457,86.918 139.836,87.297 140.007,87.297 140.243,87.533 D16.2@140.243,87.704 v1(140.243,88.748)
CFG_TMS: D15.2 IC4.T13 J8.4 | length 51.6
  TopLayer w0.125: IC4.T13@117.175,51.825 v2(117.675,52.325)
  TopLayer w0.127: J8.4@140.249,83.836 v1(140.249,84.836)
  SignalLayer1 w0.125: v2(117.675,52.325) 118.086,51.915 118.086,51.082 118.431,50.736 118.919,50.736 119.288,51.105 119.288,51.692 119.638,52.043 119.638,52.552 121.024,53.938 121.836,53.938 122.069,54.171 122.069,54.616 125.8,58.348 125.8,64.302 126.203,64.705 v1(126.203,66.506)
  BottomLayer w0.127: v1(126.203,66.506) 126.842,66.506 127.367,67.03 127.803,67.03 129.151,68.378 129.151,73.213 130.085,74.147 132.978,74.147 135.151,76.32 136.272,76.32 136.75,76.797 136.75,81.888 138.396,83.534 D15.2@140.249,83.534 v1(140.249,84.836)